# Altium PCB Vibration_Datalogger.PcbDoc (part 7 of 7)
Units mm, origin at the board's own origin, x right, y up, seen from the top; angles counter-clockwise.
Board outline 75.58 x 57.4 mm, 4 copper layers (Top Layer, Int1 (GND), Int2 (PWR), Bottom Layer), stack 1.44 mm thick; 126 components, 59 nets, 413 pads, 160 vias.
Unrouted connection lines stored in the file: 53.
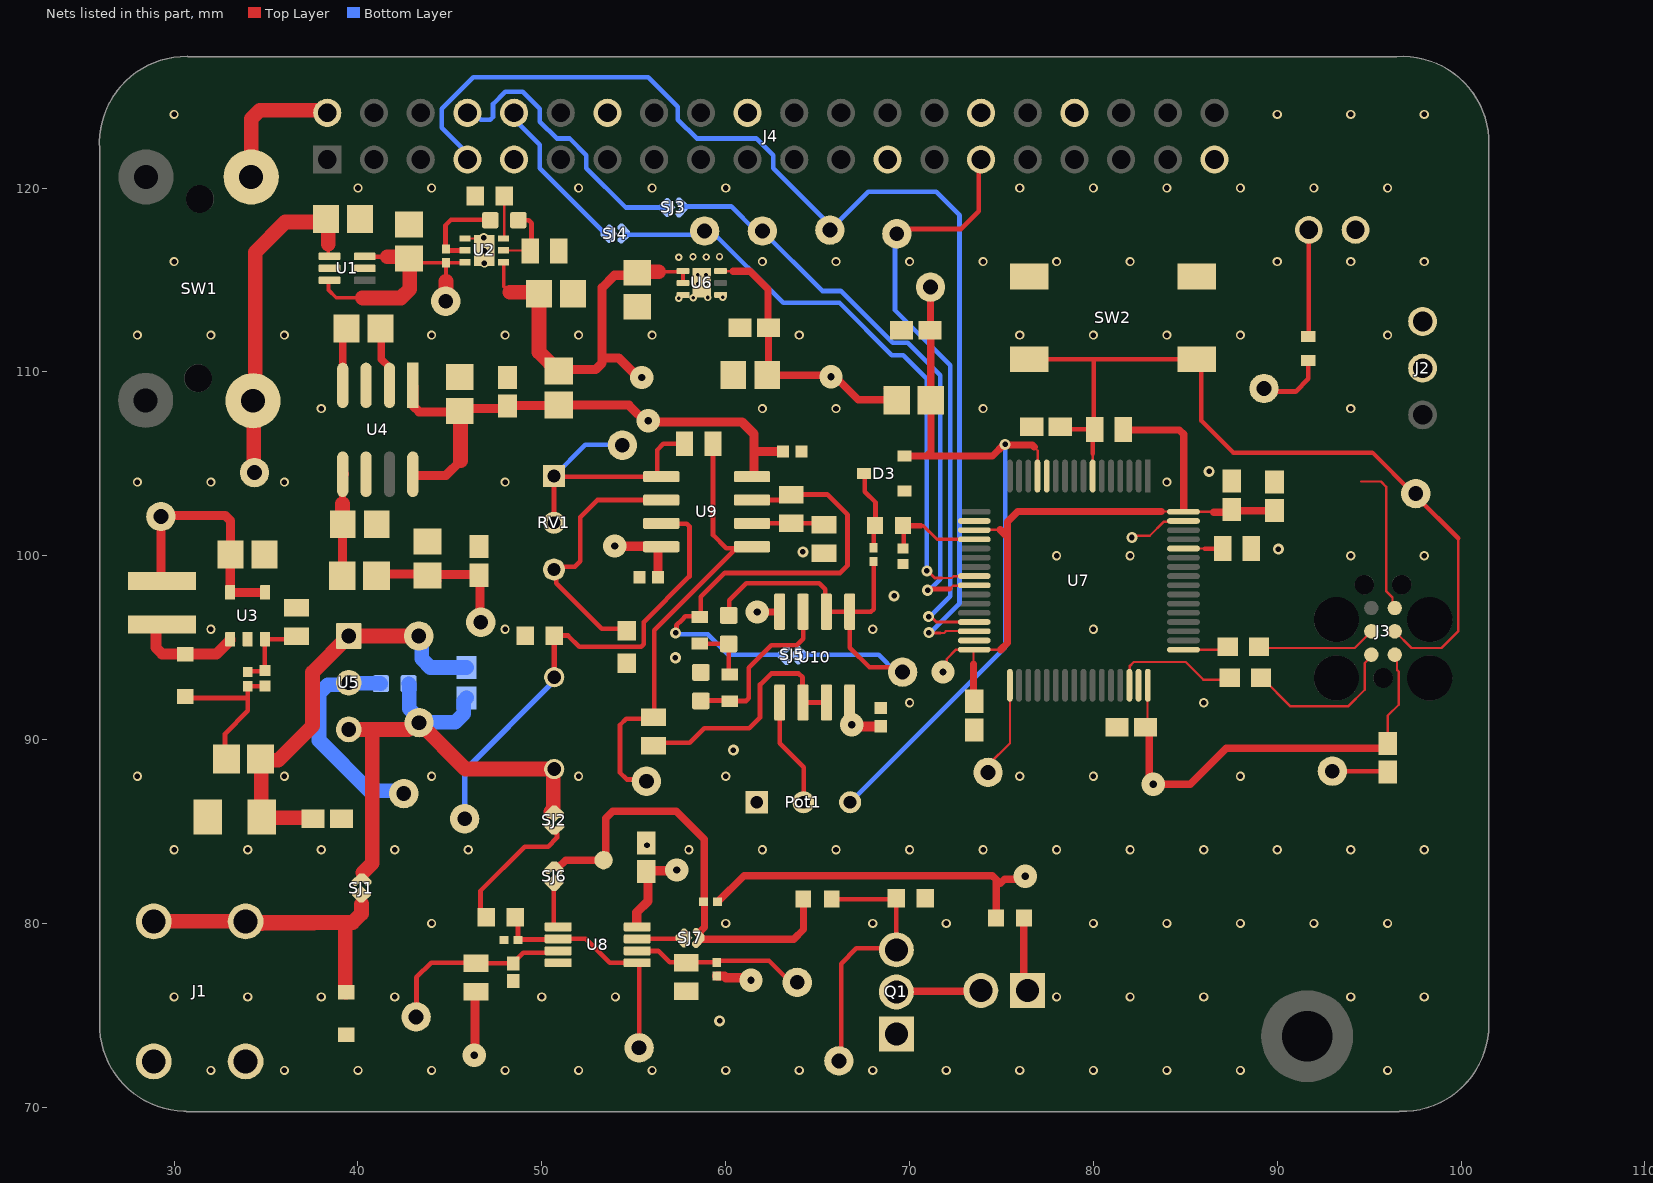
[diagram p4: the nets of this part, all layers, seen from the top]

## Via types
v1: diameter 0.5, hole 0.3, Top Layer to Bottom Layer, tented both sides, 118 vias
v2: diameter 0.6, hole 0.3, Top Layer to Bottom Layer, tented both sides, 14 vias
v3: diameter 1.27, hole 0.4, Top Layer to Int2 (PWR), tented both sides, 11 vias
v4: diameter 0.4, hole 0.2, Top Layer to Bottom Layer, tented both sides, 8 vias
v5: diameter 0.4, hole 0.2, Top Layer to Bottom Layer, 4 vias
v6: diameter 0.5, hole 0.3, Top Layer to Bottom Layer, 3 vias
v7: diameter 0.7, hole 0.3, Top Layer to Bottom Layer, 1 vias
v8: diameter 1.27, hole 0.4, Top Layer to Int2 (PWR), 1 vias

## Nets (pads, with @x,y where several pads share a name; then routed paths per layer and width w, separated by ;. In a path a pad name is that pad's centre, name@x,y a point inside that pad or via, vN(x,y) a via of type N, cw(c..) or ccw(c..) an arc to the next point about the centre after c; other vN are vias at no path point) (continued)
UART1_RX: (continued)
  Top Layer w0.254: v2(70.98,98.12) 71.046,98.186 72.186,98.186 72.21,98.21
  Bottom Layer w0.254: SJ3.1@57.597,119.143 57.743,118.997 60.299,118.997 61.636,117.66 RX1.1@62,117.66 65.26,114.4 66.258,114.4 69.078,111.58 69.91,111.58 71.67,109.82 71.67,98.724 71.066,98.12 v2(70.98,98.12)
UART1_TX: SJ4.1 TX1.1 U7.24 | length 33.2
  Top Layer w0.125: 71.77,98.79 72.3,98.79 72.39,98.88 73.508,98.88 U7.24@73.518,98.89
  Top Layer w0.175: v2(70.94,99.18) 70.97,99.18 71.36,98.79 71.77,98.79
  Bottom Layer w0.254: SJ4.1@54.45,117.31 54.599,117.459 58.649,117.459 TX1.1@58.85,117.66 59.214,117.66 63.124,113.75 66.19,113.75 69.03,110.91 69.65,110.91 70.94,109.62 v2(70.94,99.18)
UART3_RX: J4.07 RX3.1 U7.30 | length 64.1
  Top Layer w0.125: 71.69,95.8 71.89,95.8 71.99,95.9 73.508,95.9 U7.30@73.518,95.89
  Top Layer w0.175: v2(71.05,95.81) 71.06,95.8 71.69,95.8
  Top Layer w0.254: v2(71.05,95.81) v2@71.116,95.876
  Bottom Layer w0.254: J4.07@45.95,121.55 45.95,121.895 44.556,123.289 44.556,124.317 46.269,126.03 55.791,126.03 57.4,124.421 57.4,123.719 58.423,122.696 61.665,122.696 62.584,121.777 62.584,121.075 65.67,117.989 RX3.1@65.67,117.71 67.75,119.79 71.45,119.79 72.72,118.52 72.72,97.41 71.12,95.81 v2(71.05,95.81)
UART3_TX: J4.29 TX3.1 U7.29 | length 33.6
  Top Layer w0.175: v2(71.033,96.687) 71.148,96.687 71.443,96.392 73.515,96.392 U7.29@73.518,96.39
  Top Layer w0.254: TX3.1@69.31,117.51 69.568,117.768 72.798,117.768 73.76,118.73 73.76,121.42 J4.29@73.89,121.55
  Bottom Layer w0.254: TX3.1@69.31,117.51 TX3.1@69.568,117.768 ; TX3.1@69.46,117.39 69.21,117.14 69.21,113.35 72.212,110.348 72.212,97.791 71.108,96.687 v2(71.033,96.687) ; J4.29@73.89,121.55 J4.29@74.03,121.41
UVLO: R1.1 R2.2 U2.5 | length 4.9
  Top Layer w0.254: U2.5@45.82,116.603 44.867,116.603 44.76,116.71 44.76,117.98 45.06,118.28 47.166,118.28 R2.2@47.196,118.25
VADC_OUT: U7.33 VADC.1 | length 5.7
  Top Layer w0.125: VADC.1@74.27,88.21 74.27,88.609 75.46,89.799 75.46,92.948 U7.33@75.459,92.949 75.459,93.133 U7.33@75.372,93.22
  Top Layer w0.254: VADC.1@74.27,88.21 VADC.1@74.39,88.33
VDD: C15.1 C16.1 C18.1 C19.1 C20.1 C21.1 C22.1 FB4.1 J3.1 R14.1 R15.2 R18.2 R19.2 U6.6 U7.19 U7.32 U7.48 U7.64 VDD.1 | length 102.5
  Top Layer w0.125: U6.6@59.81,115.49 59.83,115.47 60.415,115.47 ; v3(71.82,93.67) 72.022,93.872 72.022,94.382 72.53,94.89 U7.32@73.518,94.89 ; 73.48,94.09 73.48,94.852 U7.32@73.518,94.89 ; U7.19@73.518,101.39 73.538,101.41 74.93,101.41 ; 74.96,94.88 73.528,94.88 U7.32@73.518,94.89 ; C20.1@82.94,90.95 82.94,92.93 U7.48@82.959,92.949 ; 83.69,102.4 84.89,102.4 U7.64@84.9,102.39 86.51,102.39 ; C18.1@96.012,89.789 96.012,91.302 96.608,91.898 96.608,93.697 96.52,93.785 96.52,94.488 J3.1@96.393,94.615
  Top Layer w0.2: 86.51,102.39 86.54,102.36
  Top Layer w0.254: FB4.1@68.705,109.109 69.305,108.509 FB4.1@69.305,108.458 ; VDD.1@89.281,109.093 89.446,108.928 90.998,108.928 91.694,109.624 R19.2@91.694,110.617
  Top Layer w0.4: R15.2@59.575,81.205 R15.2@59.55,81.18 59.575,81.18 60.995,82.6 74.498,82.6 74.71,82.388 ; 60.415,115.47 61.32,115.47 62.304,114.486 62.304,112.426 C15.1@62.33,112.4 62.33,109.9 C16.1@62.26,109.83 62.27,109.82 65.875,109.82 67.215,108.48 69.283,108.48 FB4.1@69.305,108.458 ; 73.48,94.09 73.48,92.22 C21.1@73.62,92.08 ; R18.2@74.71,80.29 74.71,82.388 ; 74.93,101.41 75.33,101.01 ; 74.96,94.88 75.33,95.25 75.33,101.01 ; v3(76.3,82.57) 76.134,82.404 75.164,82.404 74.929,82.169 74.71,82.388 ; R14.1@81.62,106.87 81.65,106.84 84.676,106.84 84.91,106.606 84.91,102.55 ; C20.1@83.03,90.92 83.03,88.015 83.25,87.795 v3(83.25,87.56) ; v3@83.133,87.577 83.21,87.5 83.287,87.577 85.277,87.577 87.234,89.534 95.757,89.534 C18.1@96.012,89.789 ; 83.69,102.4 75.89,102.4 75.33,101.84 75.33,101.01 ; 86.54,102.36 87.364,102.36 87.454,102.45 C22.1@89.85,102.45 C22.1@89.77,102.53
  other v3: 65.73,109.73
Vdet: R20.1 R21.2 U8.2 U8.5 Vdet.1 | length 13
  Top Layer w0.254: R20.1@48.55,80.34 48.7,80.19 R21.2@48.7,79.09 48.733,79.123 50.855,79.123 U8.2@50.888,79.156 52.388,79.156 53.688,77.856 U8.5@55.188,77.856 55.29,77.754 Vdet.1@55.29,73.23
VHigh: R24.2 R25.2 U8.3 VHigh.1 | length 10.7
  Top Layer w0.254: VHigh.1@43.033,74.402 VHigh.1@43.16,74.275 ; VHigh.1@43.16,74.91 43.18,74.93 43.18,77.06 43.98,77.86 46.383,77.86 R24.2@46.414,77.829 46.421,77.822 R25.2@48.45,77.822 48.45,77.866 48.982,78.398 50.78,78.398 U8.3@50.888,78.506
VLow: R22.1 R23.1 U8.6 VLOW.1 | length 9.5
  Top Layer w0.254: U8.6@55.188,78.506 55.194,78.5 56.33,78.5 56.95,77.88 57.84,77.88 R23.1@57.85,77.87 57.86,77.88 R22.1@59.51,77.88 59.59,77.96 62.356,77.96 63.526,76.79 VLOW.1@63.89,76.79
Vsen: C26.1 R7.1 R8.1 SJ1.1 SJ2.2 U5.3 Vsen.1 | length 29.4
  Top Layer w0.8: U5.3@39.497,90.551 40.78,90.551 ; 40.26,82.76 40.78,83.28 40.78,90.551 ; SJ2.2@50.502,86.077 50.616,86.19 50.616,88.335 C26.1@50.673,88.392 45.848,88.392 Vsen.1@43.32,90.92 43.104,90.92 42.735,90.551 40.78,90.551
  Bottom Layer w0.254: R7.1@45.476,91.767 45.749,92.04 45.902,92.194 R7.1@45.902,92.268
  Bottom Layer w0.8: R8.1@42.753,93.039 42.788,93.004 42.788,91.669 43.32,91.136 Vsen.1@43.32,90.92 43.34,90.94 45.28,90.94 45.749,91.409 45.749,92.04 45.749,92.115 R7.1@45.902,92.268
pads on no net: J2.3 J3. J3.6 J4.01 J4.03 J4.04 J4.05 J4.06 J4.11 J4.12 J4.13 J4.15 J4.16 J4.17 J4.18 J4.19 J4.21 J4.22 J4.23 J4.24 J4.26 J4.27 J4.28 J4.31 J4.32 J4.33 J4.35 J4.36 J4.37 J4.38 J4.40 MH1.1 SW1.2 SW1.4 SW1.5 SW1.6 U1.4 U4.7 U6.5 U7.1 U7.2 U7.3 U7.4 U7.5 U7.6 U7.8 U7.9 U7.10 U7.11 U7.14 U7.15 U7.16 U7.17 U7.21 U7.22 U7.23 U7.26 U7.27 U7.28 U7.34 U7.35 U7.36 U7.37 U7.38 U7.39 U7.40 U7.41 U7.42 U7.43 U7.44 U7.45 U7.50 U7.51 U7.52 U7.53 U7.54 U7.55 U7.56 U7.57 U7.58 U7.59 U7.61 U7.62

## Polygon pours and split planes (outlines as drawn)
GND on Bottom Layer "Bottom_GND" (solid, remove dead copper, pour order 1): 30.542,69.781 ccw(c30.64,70.15) 30.64,69.768 ccw(c30.64,70.023) 30.66,69.769 ccw(c30.7,69.89) 30.7,69.763 96.61,69.763 ccw(c96.61,69.89) 96.656,69.771 ccw(c96.785,74.495) 101.511,74.495 ccw(c96.785,74.495) 101.507,74.667 101.507,74.762 ccw(c101.13,74.82) 101.512,74.82 ccw(c101.384,74.82) 101.507,74.853 101.507,122.627 ccw(c101.384,122.66) 101.512,122.66 ccw(c101.13,122.66) 101.511,122.685 ccw(c101.13,122.71) 101.512,122.71 ccw(c101.13,122.71) 101.511,122.734 ccw(c96.795,122.435) 96.496,127.151 ccw(c96.52,126.77) 96.48,127.15 ccw(c96.44,126.77) 96.44,127.152 30.744,127.152 ccw(c30.71,127.029) 30.712,127.156 ccw(c30.661,122.431) 25.945,122.132 ccw(c26.072,122.14) 25.958,122.083 25.958,74.317 ccw(c26.33,74.23) 25.949,74.206 ccw(c30.665,74.505)
GND on Top Layer "TOP_GND" (solid, remove dead copper, pour order 0): 30.542,69.781 ccw(c30.64,70.15) 30.64,69.768 ccw(c30.64,70.023) 30.66,69.769 ccw(c30.7,69.89) 30.7,69.763 96.61,69.763 ccw(c96.61,69.89) 96.656,69.771 ccw(c96.785,74.495) 101.511,74.495 ccw(c96.785,74.495) 101.507,74.667 101.507,74.762 ccw(c101.13,74.82) 101.512,74.82 ccw(c101.384,74.82) 101.507,74.853 101.507,122.627 ccw(c101.384,122.66) 101.512,122.66 ccw(c101.13,122.66) 101.511,122.685 ccw(c101.13,122.71) 101.512,122.71 ccw(c101.13,122.71) 101.511,122.734 ccw(c96.795,122.435) 96.496,127.151 ccw(c96.52,126.77) 96.48,127.15 ccw(c96.44,126.77) 96.44,127.152 30.744,127.152 ccw(c30.71,127.029) 30.712,127.156 ccw(c30.661,122.431) 25.945,122.132 ccw(c26.072,122.14) 25.958,122.083 25.958,74.317 ccw(c26.33,74.23) 25.949,74.206 ccw(c30.665,74.505)
NetD1_2 on Top Layer "SW_Poly" (solid, remove dead copper, pour order 3): 33.461,94.04 33.473,96.79 26.618,96.79 26.618,94.02
NetC7_2 on Top Layer "FB_POLY" (solid, remove dead copper, pour order 5): 33.7,93.41 35.38,93.41 35.38,94.99 37.4,94.99 37.4,96.12 37.33,96.12 34.62,96.12 34.62,94.14 33.7,94.14
24V on Int2 (PWR) (split plane): 45.555,94.495 45.631,94.432 45.718,94.386 45.812,94.357 45.91,94.348 46.692,94.348 51.678,89.362 51.678,85.508 46.842,80.672 42.91,80.672 42.812,80.663 42.718,80.634 42.631,80.588 42.555,80.525 40.365,78.335 40.302,78.259 40.28,78.217 40.205,78.155 40.142,78.079 40.096,77.992 40.067,77.898 40.058,77.8 40.058,70.273 31.113,70.273 31.11,70.29 31.082,70.332 31.04,70.36 30.99,70.369 30.62,70.369 30.57,70.36 30.528,70.332 30.503,70.293 30.389,70.297 30.115,70.324 29.842,70.369 29.574,70.431 29.309,70.512 29.051,70.609 28.8,70.723 28.556,70.853 28.322,70.999 28.098,71.159 27.884,71.334 27.683,71.523 27.494,71.724 27.319,71.938 27.159,72.162 27.013,72.396 26.883,72.64 26.769,72.891 26.672,73.149 26.591,73.414 26.529,73.682 26.501,73.852 26.52,73.88 26.529,73.93 26.529,74.32 26.52,74.37 26.492,74.412 26.469,74.427 26.469,96.208 36.66,96.208 36.738,96.166 36.832,96.137 36.93,96.128 37.028,96.137 37.122,96.166 37.2,96.208 43.842,96.208
-5V_ANA on Int2 (PWR) (split plane): 42.855,101.205 42.931,101.142 43.018,101.096 43.112,101.067 43.21,101.058 57.752,101.058 60.315,98.495 60.391,98.432 60.478,98.386 60.572,98.357 60.67,98.348 63.202,98.348 63.968,97.582 63.968,95.338 59.962,91.332 51.38,91.332 51.282,91.323 51.188,91.294 51.174,91.287 47.255,95.205 47.179,95.268 47.092,95.314 46.998,95.343 46.9,95.352 46.118,95.352 44.405,97.065 44.329,97.128 44.242,97.174 44.148,97.203 44.05,97.212 37.432,97.212 37.432,102.638 41.422,102.638
+5 on Int2 (PWR) (split plane): 97.071,126.643 97.345,126.616 97.618,126.571 97.886,126.509 98.151,126.428 98.409,126.331 98.66,126.217 98.904,126.087 99.138,125.941 99.362,125.781 99.576,125.606 99.777,125.417 99.966,125.216 100.141,125.002 100.301,124.778 100.447,124.544 100.577,124.3 100.691,124.049 100.788,123.791 100.869,123.526 100.931,123.258 100.976,122.985 101.001,122.736 101.001,122.735 100.97,122.66 100.991,122.66 100.994,122.651 100.999,122.651 100.997,122.627 100.997,112.042 90.998,112.042 86.175,116.865 86.099,116.928 86.012,116.974 85.918,117.003 85.82,117.012 70.073,117.012 70.032,117.034 69.938,117.063 69.84,117.072 69.742,117.063 69.648,117.034 69.607,117.012 59.93,117.012 59.832,117.003 59.738,116.974 59.651,116.928 59.575,116.865 58.635,115.925 58.572,115.849 58.526,115.762 58.497,115.668 58.488,115.57 58.488,110.508 57.222,109.242 49.588,109.242 49.072,109.758 49.072,111.16 49.063,111.258 49.034,111.352 48.988,111.439 48.925,111.515 48.225,112.215 48.149,112.278 48.062,112.324 47.968,112.353 47.87,112.362 38.92,112.362 38.822,112.353 38.728,112.324 38.641,112.278 38.565,112.215 36.575,110.225 36.512,110.149 36.466,110.062 36.437,109.968 36.428,109.87 36.428,97.212 26.469,97.212 26.469,122.083 26.461,122.165 26.476,122.166 26.451,122.228 26.444,122.431 26.453,122.707 26.48,122.982 26.525,123.254 26.588,123.523 26.668,123.787 26.765,124.045 26.879,124.296 27.009,124.54 27.155,124.774 27.315,124.998 27.49,125.212 27.679,125.413 27.881,125.602 28.094,125.777 28.318,125.938 28.552,126.083 28.796,126.213 29.047,126.327 29.306,126.425 29.57,126.505 29.838,126.567 30.111,126.612 30.385,126.639 30.631,126.647 30.706,126.616 30.706,126.645 30.679,126.648 30.706,126.645 30.744,126.641 96.426,126.641 96.426,126.636 96.44,126.631 96.44,126.641 96.449,126.642 96.48,126.639 96.495,126.641 96.496,126.641 96.528,126.644 96.528,126.643 96.529,126.634 96.534,126.636 96.533,126.644 96.795,126.652
5V_ANA on Int2 (PWR) (split plane): 48.068,110.952 48.068,109.55 48.077,109.452 48.106,109.358 48.152,109.271 48.215,109.195 49.025,108.385 49.101,108.322 49.188,108.276 49.282,108.247 49.38,108.238 57.078,108.238 57.078,107.29 57.087,107.192 57.116,107.098 57.162,107.011 57.225,106.935 59.235,104.925 59.311,104.862 59.398,104.816 59.492,104.787 59.59,104.778 62.852,104.778 69.098,98.532 69.098,86.508 67.492,84.902 64.67,84.902 64.572,84.893 64.478,84.864 64.391,84.818 64.315,84.755 62.225,82.665 62.162,82.589 62.116,82.502 62.087,82.408 62.078,82.31 62.078,70.273 41.062,70.273 41.062,77.614 41.075,77.625 43.118,79.668 47.05,79.668 47.148,79.677 47.242,79.706 47.329,79.752 47.405,79.815 52.535,84.945 52.598,85.021 52.644,85.108 52.673,85.202 52.682,85.3 52.682,89.57 52.673,89.668 52.644,89.762 52.598,89.849 52.535,89.925 52.133,90.328 60.17,90.328 60.268,90.337 60.362,90.366 60.449,90.412 60.525,90.475 64.825,94.775 64.888,94.851 64.934,94.938 64.963,95.032 64.972,95.13 64.972,97.79 64.963,97.888 64.934,97.982 64.888,98.069 64.825,98.145 63.765,99.205 63.689,99.268 63.602,99.314 63.508,99.343 63.41,99.352 60.878,99.352 58.315,101.915 58.239,101.978 58.152,102.024 58.058,102.053 57.96,102.062 43.418,102.062 41.985,103.495 41.909,103.558 41.822,103.604 41.728,103.633 41.63,103.642 37.432,103.642 37.432,109.662 39.128,111.358 47.662,111.358
AVDD on Int2 (PWR) (split plane): 74.068,110.54 74.077,110.442 74.106,110.348 74.152,110.261 74.208,110.193 74.216,110.168 74.262,110.081 74.325,110.005 75.485,108.845 75.561,108.782 75.648,108.736 75.742,108.707 75.84,108.698 76.042,108.698 77.338,107.402 77.338,107.18 77.347,107.082 77.376,106.988 77.398,106.947 77.398,103.748 77.042,103.392 71.248,103.392 70.945,103.695 69.155,105.485 69.148,105.499 69.112,105.542 69.112,106.312 69.115,106.315 70.195,107.395 70.258,107.471 70.304,107.558 70.333,107.652 70.342,107.75 70.342,116.008 74.068,116.008
VDD on Int2 (PWR) (split plane): 90.435,111.185 90.511,111.122 90.598,111.076 90.692,111.047 90.79,111.038 100.997,111.038 100.997,99.53 91.4,99.53 91.4,91.21 100.997,91.21 100.997,74.853 100.998,74.839 100.991,74.82 100.97,74.82 100.997,74.754 100.997,74.667 100.999,74.648 100.997,74.648 101.002,74.512 101,74.495 101.002,74.478 100.993,74.219 100.966,73.945 100.921,73.672 100.859,73.404 100.778,73.139 100.681,72.881 100.567,72.63 100.437,72.386 100.291,72.152 100.131,71.928 99.956,71.714 99.767,71.513 99.566,71.324 99.352,71.149 99.128,70.989 98.894,70.843 98.65,70.713 98.399,70.599 98.141,70.502 97.876,70.421 97.608,70.359 97.335,70.314 97.061,70.287 96.785,70.278 96.67,70.282 96.67,70.28 96.656,70.282 96.61,70.277 96.61,70.305 96.534,70.273 63.082,70.273 63.082,82.102 64.878,83.898 67.7,83.898 67.798,83.907 67.892,83.936 67.979,83.982 68.055,84.045 69.955,85.945 70.018,86.021 70.064,86.108 70.093,86.202 70.102,86.3 70.102,98.74 70.093,98.838 70.064,98.932 70.018,99.019 69.955,99.095 63.415,105.635 63.339,105.698 63.252,105.744 63.158,105.773 63.06,105.782 59.798,105.782 58.082,107.498 58.082,108.682 59.345,109.945 59.408,110.021 59.454,110.108 59.483,110.202 59.492,110.3 59.492,115.362 60.138,116.008 69.338,116.008 69.338,107.958 68.441,107.061 68.418,107.054 68.331,107.008 68.255,106.945 68.192,106.869 68.146,106.782 68.117,106.688 68.108,106.59 68.108,105.34 68.117,105.242 68.146,105.148 68.192,105.061 68.255,104.985 68.285,104.955 68.292,104.941 68.355,104.865 70.235,102.985 70.685,102.535 70.761,102.472 70.848,102.426 70.942,102.397 71.04,102.388 77.25,102.388 77.348,102.397 77.442,102.426 77.529,102.472 77.605,102.535 78.255,103.185 78.318,103.261 78.364,103.348 78.393,103.442 78.402,103.54 78.402,107.1 78.393,107.198 78.364,107.292 78.342,107.333 78.342,107.61 78.333,107.708 78.304,107.802 78.258,107.889 78.195,107.965 76.605,109.555 76.529,109.618 76.442,109.664 76.348,109.693 76.25,109.702 76.048,109.702 75.072,110.678 75.072,116.008 85.612,116.008
GND on Int1 (GND) (split plane): 164 vertices, not listed, extent 26.444,70.273 101.002,126.652
GND on Int1 (GND) (split plane): 26.459,74.206 26.458,74.216
GND on Int1 (GND) (split plane): 30.641,70.282 30.652,70.279 30.641,70.282 30.64,70.282
GND on Int1 (GND) (split plane): 101.001,74.808 101,74.82

## Keep-outs
Keep-Out Layer:
  lines w0.254: 26.066,74.703 ccw(c30.66,74.518) 30.66,69.92 96.61,69.89 ; 26.07,74.27 26.076,122.14 ; 26.072,122.14 cw(c30.661,122.431) 30.71,127.029 ; 26.086,122.14 cw(c26.34,122.14) 26.087,122.17 cw(c26.34,122.2) 26.086,122.184 ; 30.537,127.024 96.44,127.024 cw(c96.44,126.77) 96.48,127.021 cw(c96.52,126.77) 96.504,127.024 cw(c96.795,122.435) 101.384,122.726 cw(c101.13,122.71) 101.384,122.71 cw(c101.13,122.71) 101.383,122.685 cw(c101.13,122.66) 101.384,122.66 ; 96.55,69.896 ccw(c96.55,70.15) 96.6,69.901 ccw(c96.785,74.495) 101.383,74.495 ccw(c96.785,74.495) 101.376,74.754 ccw(c101.13,74.82) 101.384,74.82 ; 101.38,74.48 101.38,122.66

## Other copper
Int1 (GND) (plane layer: these items are gaps in the copper):
  pour cut-out: 101.38,99.35 101.29,99.44 91.59,99.44 91.59,91.12 101.51,91.12
Int2 (PWR) (plane layer: these items are gaps in the copper):
  pour cut-out: 101.19,99.44 101.1,99.53 91.4,99.53 91.4,91.21 101.32,91.21
  lines w0.254: 26.4,73.93 26.4,74.32 ; 30.62,70.24 30.99,70.24
  lines w1: 26.19,96.71 44.05,96.71 45.91,94.85 46.9,94.85 52.18,89.57 52.18,85.3 47.05,80.17 42.91,80.17 40.72,77.98 ; 36.93,96.63 36.93,109.87 38.92,111.86 47.87,111.86 48.57,111.16 48.57,109.55 49.38,108.74 57.43,108.74 58.99,110.3 58.99,115.57 59.93,116.51 85.82,116.51 90.79,111.54 101.47,111.54 ; 37.42,103.14 41.63,103.14 43.21,101.56 57.96,101.56 60.67,98.85 63.41,98.85 64.47,97.79 64.47,95.13 60.17,90.83 51.38,90.83 ; 40.56,70.26 40.56,77.8 ; 57.58,108.85 57.58,107.29 59.59,105.28 63.06,105.28 69.6,98.74 69.6,86.3 67.7,84.4 64.67,84.4 62.58,82.31 62.58,69.94 ; 68.61,106.59 68.61,105.34 68.73,105.22 ; 68.71,105.22 70.59,103.34 71.04,102.89 77.25,102.89 77.9,103.54 77.9,107.1 ; 68.76,106.67 69.84,107.75 69.84,116.57 ; 74.57,110.54 74.57,116.31 ; 74.68,110.36 75.84,109.2 76.25,109.2 77.84,107.61 77.84,107.18
  text "+5" at 74.92,117.206 h3
  text "AVDD" at 71.86,106.27 h1
  text "-5V_ANA" at 47.49,96.684 h2
  text "+24" at 31.86,88.21 h2
  text "VDD" at 79.23,80.18 h3
  text "5V_ANA" at 46.85,77.524 h2
Multi-Layer:
  pour cut-out: 100.42,91.08 100.42,99.39 91.52,99.39 91.52,91.08

## Silkscreen, mask and mechanical layers (free items; w line width, h text height)
Top Overlay:
  drawing of 67 lines, arcs and shapes, not listed
  text "POWER" at 96.37,119.661 h1
  text "RESET" at 78.43,116.987 h1.52
  text "DEBUG" at 91.183,92.58 h1.52 r90
  text "MCU" at 76.07,88.757 h1.52
  text "Datalogger Monocanal 0-10 kHz" at 80.53,83.146 h1.52
  text "Variant: 2.0" at 87.401,81.327 h1.52
  text "Date Mfg : 11/08/2026" at 84.24,79.396 h1.52
  text "OK" at 78.71,78.117 h1.52
Bottom Overlay:
  text "A+" at 37.3,79.05 h1.52 r270
  text "HW Designer : Dhimni Salim" at 99.12,78.176 h1.52
  text "GND" at 36.867,70.95 h1.52 r270
Mechanical 1:
  lines w0.254: 20.535,72.07 21.191,70.066 ; 20.823,125.52 21.501,127.516 ; 20.937,70.067 21.445,70.065 ; 21.247,127.517 21.755,127.515 ; 21.289,88.307 21.191,70.066 ; 21.402,109.275 21.501,127.516 ; 21.868,72.062 21.191,70.066 ; 22.156,125.512 21.501,127.516 ; 26.235,130.89 26.238,130.382 ; 27.758,131.153 26.237,130.636 ; 27.764,130.137 26.237,130.636 ; 55.702,130.809 26.237,130.636 ; 71.991,130.904 101.457,131.076 ; 99.93,131.575 101.457,131.076 ; 99.936,130.559 101.457,131.076 ; 101.455,131.33 101.458,130.822
  text "75.221 (mm)" at 55.963,129.648 h1.52 r0.34
  text "57.451 (mm)" at 22.69,88.553 h2 r89.69

## Text inside footprints (layer, text, board x,y; h text height)
D5: Mechanical 13 "+" at 88.322,117.152 h1.02; Top Overlay "+" at 88.329,117.139 h1.02
J1: Mechanical 13 "1" at 30.79,80.61 h1.27 r270